# Altium PCB IDC_Tester_v1.PcbDoc (part 5 of 5)
Units mm, origin at the board's own origin, x right, y up, seen from the top; angles counter-clockwise.
Board outline 140 x 140 mm, 2 copper layers (Top Layer, Bottom Layer); 594 components, 528 nets, 1855 pads, 179 vias.
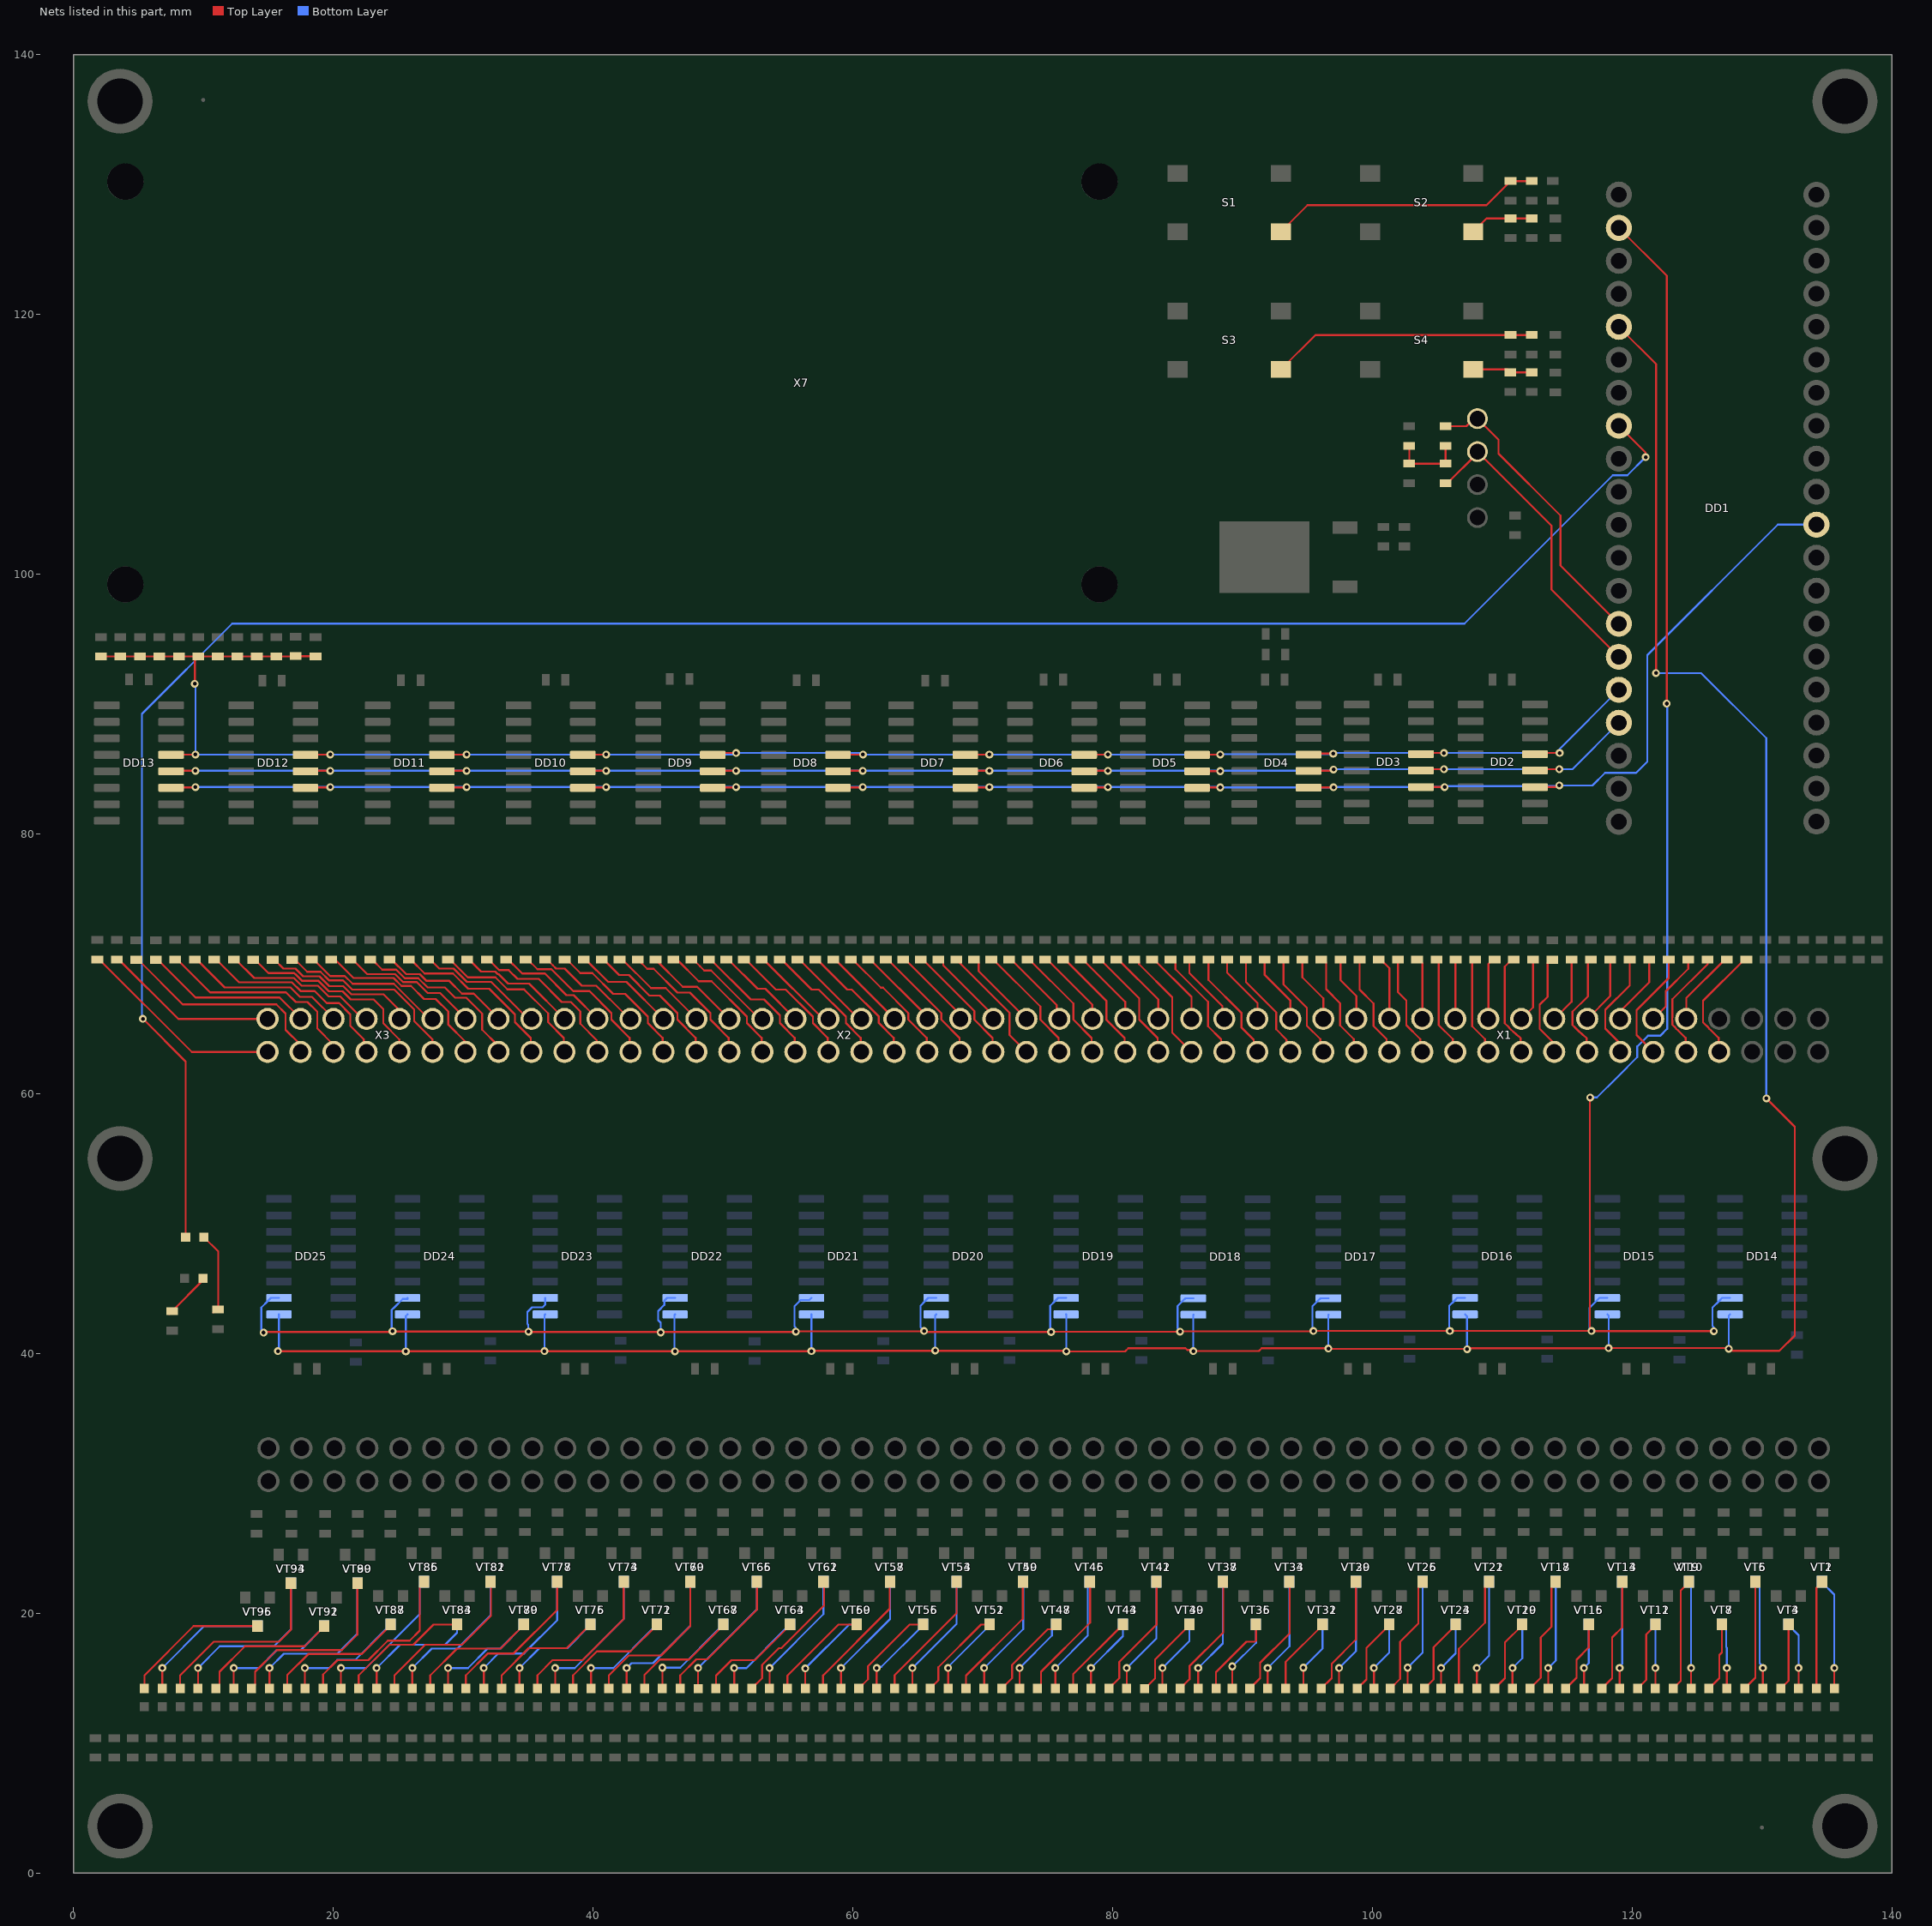
[diagram p4: the nets of this part, all layers, seen from the top]

## Via types
v1: diameter 0.6, hole 0.3, Top Layer to Bottom Layer, 179 vias

## Nets (pads, with @x,y where several pads share a name; then routed paths per layer and width w, separated by ;. In a path a pad name is that pad's centre, name@x,y a point inside that pad or via, vN(x,y) a via of type N, cw(c..) or ccw(c..) an arc to the next point about the centre after c; other vN are vias at no path point) (continued)
NetR224_2: R224.2 X1.8 | length 9.1
  Top Layer w0.15: X1.8@126.725,63.21 126.67,63.265 126.67,64.285 126.061,64.894 126.054,64.901 cw(c126.713,65.75) 125.864,65.091 125.857,65.098 125.519,65.436 125.475,65.48 125.475,67.15 128.65,70.325 R224.2@128.8,70.325
NetR225_2: R225.2 X1.9 | length 6
  Top Layer w0.15: X1.9@124.185,65.75 124.185,67.36 127.15,70.325 R225.2@127.3,70.325
NetR226_2: R226.2 X1.10 | length 8.7
  Top Layer w0.15: X1.10@124.185,63.21 124.13,63.265 124.13,64.285 123.521,64.894 123.514,64.901 cw(c124.173,65.75) 123.324,65.091 123.317,65.098 123.11,65.305 123.11,65.59 cw(c124.173,65.75) 123.11,65.91 123.11,66.791 123.11,67.26 125.825,69.975 R226.2@125.825,70.325
NetR227_2: R227.2 X1.11 | length 5.7
  Top Layer w0.15: X1.11@121.645,65.75 122.6,66.705 122.6,67.875 124.325,69.6 R227.2@124.325,70.325
NetR228_2: R228.2 X1.12 | length 8.7
  Top Layer w0.15: X1.12@121.645,63.21 120.35,64.505 120.35,66.425 122.825,68.9 R228.2@122.825,70.325
NetR229_2: R229.2 X1.13 | length 5.5
  Top Layer w0.15: X1.13@119.093,65.75 119.093,66.343 121.325,68.575 R229.2@121.325,70.325
NetR230_2: R230.2 X1.14 | length 8.4
  Top Layer w0.15: X1.14@119.105,63.21 119.05,63.265 119.05,63.9 119.006,63.944 117.95,65 117.95,66.45 119.825,68.325 R230.2@119.825,70.325
NetR231_2: R231.2 X1.15 | length 5.3
  Top Layer w0.15: X1.15@116.565,65.75 118.325,67.51 R231.2@118.325,70.325
NetR232_2: R232.2 X1.16 | length 8.2
  Top Layer w0.15: X1.16@116.565,63.21 116.51,63.265 116.51,64.211 ccw(c116.36,64.211) 116.452,64.329 cw(c121.567,70.92) 115.691,64.997 cw(c116.449,65.76) 115.6,65.101 115.425,65.276 115.425,66.3 116.6,67.475 116.6,70.1 R232.2@116.825,70.325
NetR233_2: R233.2 X1.17 | length 5.1
  Top Layer w0.15: X1.17@114.025,65.75 115.35,67.075 R233.2@115.35,70.325
NetR234_2: R234.2 X1.18 | length 8.1
  Top Layer w0.15: R234.2@113.875,70.3 113.725,70.3 113.5,70.075 113.5,67.45 112.896,66.846 112.896,64.979 113.926,63.949 113.97,63.905 113.97,63.265 X1.18@114.025,63.21
NetR235_2: R235.2 X1.19 | length 4.9
  Top Layer w0.15: X1.19@111.485,65.75 112.375,66.64 R235.2@112.375,70.325
NetR236_2: R236.2 X1.20 | length 8
  Top Layer w0.15: R236.2@110.9,70.325 110.75,70.325 110.2,69.775 110.2,65.421 110.525,65.096 ccw(c111.374,65.755) 110.616,64.993 ccw(c116.456,70.879) 111.372,64.329 cw(c111.28,64.211) 111.43,64.211 111.43,63.265 X1.20@111.485,63.21
NetR237_2: R237.2 X1.21 | length 4.9
  Top Layer w0.15: X1.21@108.945,65.75 108.945,69.995 109.275,70.325 R237.2@109.425,70.325
NetR238_2: R238.2 X1.22 | length 7.7
  Top Layer w0.15: R238.2@107.925,70.325 107.7,70.1 107.7,65.178 108.691,64.188 108.691,63.464 X1.22@108.945,63.21
NetR239_2: R239.2 X1.23 | length 4.6
  Top Layer w0.15: X1.23@106.405,65.75 106.405,70.305 R239.2@106.425,70.325
NetR240_2: R240.2 X1.24 | length 7.7
  Top Layer w0.15: R240.2@104.95,70.325 105.125,70.15 105.125,65.275 106.203,64.197 106.203,63.412 X1.24@106.405,63.21
NetR241_2: R241.2 X1.25 | length 4.8
  Top Layer w0.15: R241.2@103.45,70.325 103.6,70.325 103.865,70.06 X1.25@103.865,65.75
NetR242_2: R242.2 X1.26 | length 7.9
  Top Layer w0.15: R242.2@101.975,70.325 101.975,67.81 102.625,67.16 102.625,65.275 103.703,64.197 103.703,63.372 X1.26@103.865,63.21
NetR243_2: R243.2 X1.27 | length 5
  Top Layer w0.15: R243.2@100.5,70.325 100.65,70.325 101.325,69.65 X1.27@101.325,65.75
NetR244_2: R244.2 X1.28 | length 8.1
  Top Layer w0.15: R244.2@99.025,70.325 99.025,68.015 100.1,66.94 100.1,65.2 101.103,64.197 101.103,63.432 X1.28@101.325,63.21
NetR245_2: R245.2 X1.29 | length 5.1
  Top Layer w0.15: R245.2@97.55,70.325 97.55,68.752 98.785,67.517 X1.29@98.785,65.75
NetR246_2: R246.2 X1.30 | length 8.3
  Top Layer w0.15: R246.2@96.075,70.325 96.225,70.325 96.45,70.1 96.45,68.032 97.525,66.957 97.525,65.25 98.578,64.197 98.578,63.417 X1.30@98.785,63.21
NetR247_2: R247.2 X1.31 | length 5.2
  Top Layer w0.15: R247.2@94.625,70.325 94.625,68.945 96.245,67.325 X1.31@96.245,65.75
NetR248_2: R248.2 X1.32 | length 8.4
  Top Layer w0.15: R248.2@93.175,70.325 93.175,68.4 94.975,66.6 94.975,65.225 96.003,64.197 96.003,63.452 X1.32@96.245,63.21
NetR249_2: R249.2 X1.33 | length 5.4
  Top Layer w0.15: R249.2@91.725,70.325 91.725,69.125 93.705,67.145 X1.33@93.705,65.75
NetR250_2: R250.2 X1.34 | length 8.5
  Top Layer w0.15: R250.2@90.275,70.325 90.275,68.58 92.6,66.255 92.6,64.95 93.406,64.144 93.406,63.509 X1.34@93.705,63.21
NetR251_2: R251.2 X1.35 | length 5.5
  Top Layer w0.15: R251.2@88.825,70.325 88.825,69.305 91.165,66.965 X1.35@91.165,65.75
NetR252_2: R252.2 X1.36 | length 8.7
  Top Layer w0.15: R252.2@87.4,70.325 87.4,68.747 89.925,66.222 89.925,65.1 90.874,64.151 90.874,63.501 X1.36@91.165,63.21
NetR253_2: R253.2 X1.37 | length 5.7
  Top Layer w0.15: R253.2@85.925,70.325 85.925,69.275 88.463,66.737 88.463,65.912 X1.37@88.625,65.75
NetR254_2: R254.2 X1.38 | length 8.9
  Top Layer w0.15: R254.2@84.475,70.325 84.625,70.325 84.85,70.1 84.85,69.575 87.364,67.061 87.364,65.186 88.366,64.184 88.366,63.469 X1.38@88.625,63.21
NetR255_2: R255.2 X1.39 | length 5.9
  Top Layer w0.15: R255.2@83.05,70.325 83.2,70.325 86.085,67.44 X1.39@86.085,65.75
NetR256_2: R256.2 X1.40 | length 9
  Top Layer w0.15: R256.2@81.675,70.325 81.825,70.325 82.05,70.1 82.05,69.975 84.607,67.418 84.607,64.688 X1.40@86.085,63.21
NetR257_2: R257.2 X2.1 | length 6
  Top Layer w0.15: R257.2@80.3,70.325 80.45,70.325 83.532,67.243 X2.1@83.532,65.75
NetR258_2: R258.2 X2.2 | length 9.1
  Top Layer w0.15: R258.2@78.925,70.325 79.075,70.325 82.067,67.333 82.067,65.695 83.477,64.285 83.477,63.265 X2.2@83.532,63.21
NetR259_2: R259.2 X2.3 | length 6.1
  Top Layer w0.15: R259.2@77.575,70.325 77.725,70.325 80.992,67.058 X2.3@80.992,65.75
NetR260_2: R260.2 X2.4 | length 9.2
  Top Layer w0.15: R260.2@76.2,70.325 76.35,70.325 79.527,67.148 79.527,65.695 80.937,64.285 80.937,63.265 X2.4@80.992,63.21
NetR261_2: R261.2 X2.5 | length 6.2
  Top Layer w0.15: R261.2@74.825,70.325 74.975,70.325 78.452,66.848 X2.5@78.452,65.75
NetR262_2: R262.2 X2.6 | length 9.3
  Top Layer w0.15: R262.2@73.45,70.325 73.6,70.325 76.987,66.938 76.987,65.695 78.397,64.285 78.397,63.265 X2.6@78.452,63.21
NetR263_2: R263.2 X2.7 | length 6.3
  Top Layer w0.15: R263.2@72.05,70.325 72.2,70.325 75.7,66.825 75.7,65.962 X2.7@75.912,65.75
NetR264_2: R264.2 X2.8 | length 9.4
  Top Layer w0.15: R264.2@70.675,70.325 70.825,70.325 74.447,66.703 74.447,65.695 75.857,64.285 75.857,63.265 X2.8@75.912,63.21
NetR265_2: R265.2 X2.9 | length 6.3
  Top Layer w0.15: R265.2@69.325,70.325 69.475,70.325 69.7,70.1 69.7,69.422 X2.9@73.372,65.75
NetR266_2: R266.2 X2.10 | length 9.4
  Top Layer w0.15: R266.2@67.975,70.325 72.075,66.225 72.075,64.507 X2.10@73.372,63.21
NetR267_2: R267.2 X2.11 | length 6.4
  Top Layer w0.15: R267.2@66.6,70.325 66.75,70.325 66.975,70.1 66.975,69.875 70.832,66.018 X2.11@70.832,65.75
NetR268_2: R268.2 X2.12 | length 9.5
  Top Layer w0.15: R268.2@65.25,70.325 65.4,70.325 69.367,66.358 69.367,65.695 70.777,64.285 70.777,63.265 X2.12@70.832,63.21
NetR269_2: R269.2 X2.13 | length 6.5
  Top Layer w0.15: R269.2@63.9,70.325 64.05,70.325 68.292,66.083 X2.13@68.292,65.75
NetR270_2: R270.2 X2.14 | length 9.6
  Top Layer w0.15: R270.2@62.55,70.325 62.7,70.325 66.827,66.198 66.827,65.695 68.237,64.285 68.237,63.265 X2.14@68.292,63.21
NetR271_2: R271.2 X2.15 | length 6.5
  Top Layer w0.15: R271.2@61.2,70.325 61.35,70.325 65.752,65.923 X2.15@65.752,65.75
NetR272_2: R272.2 X2.16 | length 9.7
  Top Layer w0.15: R272.2@59.85,70.325 60,70.325 62.177,68.148 62.335,68.148 64.287,66.195 64.287,65.695 65.697,64.285 65.697,63.265 X2.16@65.752,63.21
NetR273_2: R273.2 X2.17 | length 6.6
  Top Layer w0.15: R273.2@58.5,70.325 58.65,70.325 63.212,65.763 X2.17@63.212,65.75
NetR274_2: R274.2 X2.18 | length 9.9
  Top Layer w0.15: R274.2@57.125,70.325 57.275,70.325 59.587,68.013 59.929,68.013 62.016,65.926 62.016,65.425 63.157,64.285 63.157,63.265 X2.18@63.212,63.21
NetR275_2: R275.2 X2.19 | length 6.8
  Top Layer w0.15: R275.2@55.75,70.325 55.9,70.325 60.475,65.75 X2.19@60.672,65.75
NetR276_2: R276.2 X2.20 | length 10.1
  Top Layer w0.15: R276.2@54.375,70.325 54.525,70.325 56.837,68.013 57.389,68.013 59.476,65.926 59.476,65.425 60.617,64.285 60.617,63.265 X2.20@60.672,63.21
NetR277_2: R277.2 X2.21 | length 7
  Top Layer w0.15: R277.2@53,70.325 53.15,70.325 57.725,65.75 X2.21@58.132,65.75
NetR278_2: R278.2 X2.22 | length 10.3
  Top Layer w0.15: R278.2@51.625,70.325 51.775,70.325 54.087,68.013 54.849,68.013 56.936,65.926 56.936,65.425 58.077,64.285 58.077,63.265 X2.22@58.132,63.21
NetR279_2: R279.2 X2.23 | length 7.2
  Top Layer w0.15: R279.2@50.275,70.325 50.425,70.325 52.677,68.073 53.269,68.073 X2.23@55.592,65.75
NetR280_2: R280.2 X2.24 | length 10.6
  Top Layer w0.15: R280.2@48.925,70.325 49.075,70.325 52.15,67.25 53.175,67.25 54.396,66.029 54.396,65.425 55.537,64.285 55.537,63.265 X2.24@55.592,63.21
NetR281_2: R281.2 X2.25 | length 7.4
  Top Layer w0.15: R281.2@47.575,70.325 47.725,70.325 48.25,69.8 48.575,69.475 49.1,69.475 52.825,65.75 X2.25@53.052,65.75
NetR282_2: R282.2 X2.26 | length 10.7
  Top Layer w0.15: R282.2@46.2,70.325 46.475,70.325 48.15,68.65 49.132,68.65 51.856,65.926 51.856,65.425 52.997,64.285 52.997,63.265 X2.26@53.052,63.21
NetR283_2: R283.2 X2.27 | length 7.6
  Top Layer w0.15: R283.2@44.825,70.325 46.925,68.225 48.026,68.225 50.501,65.75 X2.27@50.512,65.75
NetR284_2: R284.2 X2.28 | length 10.9
  Top Layer w0.15: R284.2@43.45,70.325 44.175,69.6 44.675,69.6 46.502,67.773 47.469,67.773 49.047,66.195 49.047,65.695 50.457,64.285 50.457,63.265 X2.28@50.512,63.21
NetR285_2: R285.2 X2.29 | length 7.8
  Top Layer w0.15: R285.2@42.05,70.325 42.275,70.325 44.475,68.125 45.597,68.125 X2.29@47.972,65.75
NetR286_2: R286.2 X2.30 | length 11.1
  Top Layer w0.15: R286.2@40.675,70.325 40.825,70.325 42.025,69.125 42.775,69.125 44.35,67.55 45.152,67.55 46.507,66.195 46.507,65.695 47.917,64.285 47.917,63.265 X2.30@47.972,63.21
NetR287_2: R287.2 X2.31 | length 8
  Top Layer w0.15: R287.2@39.3,70.325 39.45,70.325 41.175,68.6 42.582,68.6 X2.31@45.432,65.75
NetR288_2: R288.2 X2.32 | length 11.4
  Top Layer w0.15: R288.2@37.825,70.325 37.975,70.325 38.2,70.1 39.025,69.275 39.95,69.275 41.55,67.675 42.487,67.675 44.236,65.926 44.236,65.425 45.377,64.285 45.377,63.265 X2.32@45.432,63.21
NetR289_2: R289.2 X2.33 | length 8.5
  Top Layer w0.15: R289.2@36.325,70.325 36.475,70.325 36.925,69.875 37.175,69.625 37.825,69.625 39.15,68.3 40.25,68.3 41.289,67.262 41.313,67.262 42.825,65.75 X2.33@42.892,65.75
NetR290_2: R290.2 X2.34 | length 11.9
  Top Layer w0.15: R290.2@34.825,70.325 34.975,70.325 35.725,69.575 36.8,69.575 38.49,67.885 39.737,67.885 41.427,66.195 41.427,65.695 42.837,64.285 42.837,63.265 X2.34@42.892,63.21
NetR291_2: R291.2 X2.35 | length 8.9
  Top Layer w0.15: R291.2@33.325,70.325 33.475,70.325 34.328,69.472 34.562,69.238 36.312,69.238 37.965,67.585 38.517,67.585 X2.35@40.352,65.75
NetR292_2: R292.2 X2.36 | length 12.5
  Top Layer w0.15: R292.2@31.825,70.325 31.975,70.325 32.8,69.5 33.525,69.5 34.2,68.825 35.825,68.825 37.6,67.05 38.3,67.05 39.025,66.325 39.025,65.375 40.297,64.103 40.297,63.265 X2.36@40.352,63.21
NetR293_2: R293.2 X2.37 | length 9.4
  Top Layer w0.15: R293.2@30.325,70.325 30.475,70.325 31.4,69.4 32.475,69.4 32.676,69.2 32.75,69.2 33.475,68.475 35.087,68.475 X2.37@37.812,65.75
NetR294_2: R294.2 X2.38 | length 12.9
  Top Layer w0.15: R294.2@28.85,70.325 29,70.325 30.375,68.95 32.501,68.95 33.426,68.025 34.7,68.025 36.55,66.175 36.55,65.492 37.757,64.285 37.757,63.265 X2.38@37.812,63.21
NetR295_2: R295.2 X2.39 | length 9.8
  Top Layer w0.15: R295.2@27.325,70.325 27.475,70.325 28.175,69.625 29.276,69.625 30.301,68.6 32.175,68.6 35.025,65.75 X2.39@35.272,65.75
NetR296_2: R296.2 X2.40 | length 13.3
  Top Layer w0.15: R296.2@25.825,70.325 25.975,70.325 27.05,69.25 29.226,69.25 30.401,68.075 32.025,68.075 34,66.1 34,65.502 35.217,64.285 35.217,63.265 X2.40@35.272,63.21
NetR297_2: R297.2 X3.1 | length 10.3
  Top Layer w0.15: R297.2@24.35,70.325 24.5,70.325 25.625,69.2 26.676,69.2 27.201,68.675 28.95,68.675 29.925,67.7 30.822,67.7 X3.1@32.782,65.74
NetR298_2: R298.2 X3.2 | length 13.8
  Top Layer w0.15: R298.2@22.85,70.325 23,70.325 23.775,69.55 24.851,69.55 25.513,68.888 26.564,68.888 27.276,68.175 28.6,68.175 29.4,67.375 30.253,67.375 31.475,66.153 31.475,64.925 32.678,63.722 32.678,63.304 X3.2@32.782,63.2
NetR299_2: R299.2 X3.3 | length 10.8
  Top Layer w0.15: R299.2@21.35,70.325 21.5,70.325 22.625,69.2 24.776,69.2 25.389,68.588 26.439,68.588 27.277,67.75 28.232,67.75 X3.3@30.242,65.74
NetR300_2: R300.2 X3.4 | length 14.4
  Top Layer w0.15: R300.2@19.85,70.325 20.15,70.325 21.575,68.9 22.501,68.9 24.652,68.9 25.264,68.288 25.987,68.288 27,67.275 27.9,67.275 28.875,66.3 28.875,65.3 30.187,63.988 30.187,63.255 X3.4@30.242,63.2
NetR301_2: R301.2 X3.5 | length 11.3
  Top Layer w0.15: R301.2@18.35,70.325 18.5,70.325 19.775,69.05 20.9,69.05 21.5,68.45 24.678,68.45 27.388,65.74 X3.5@27.702,65.74
NetR302_2: R302.2 X3.6 | length 14.8
  Top Layer w0.15: R302.2@16.85,70.3 17.075,70.3 18,69.375 19.026,69.375 19.676,68.725 20.751,68.725 21.476,68 24.704,68 26.237,66.467 26.237,65.588 27.647,64.178 X3.6@27.647,63.255
NetR303_2: R303.2 X3.7 | length 12.1
  Top Layer w0.15: R303.2@15.35,70.3 15.5,70.3 16.175,69.625 17.1,69.625 17.7,69.025 18.951,69.025 19.701,68.275 20.777,68.275 21.402,67.65 23.875,67.65 25.162,66.363 X3.7@25.162,65.74
NetR304_2: R304.2 X3.8 | length 15.3
  Top Layer w0.15: R304.2@13.85,70.3 14,70.3 15.025,69.275 17,69.275 17.075,69.2 17.099,69.2 17.624,68.675 18.877,68.675 19.677,67.875 20.725,67.875 20.825,67.775 21.35,67.25 23.116,67.25 23.865,66.5 23.865,65.41 25.107,64.168 X3.8@25.107,63.255
NetR305_2: R305.2 X3.9 | length 12.2
  Top Layer w0.15: R305.2@12.35,70.325 12.5,70.325 13.925,68.9 16.975,68.9 17.575,68.3 18.828,68.3 19.653,67.475 20.55,67.475 22.285,65.74 X3.9@22.622,65.74
NetR306_2: R306.2 X3.10 | length 15.7
  Top Layer w0.15: R306.2@10.85,70.325 11,70.325 12.75,68.575 16.825,68.575 17.5,67.9 18.575,67.9 19.51,66.965 20.46,66.965 21.325,66.1 21.325,65.225 22.368,64.182 22.368,63.454 X3.10@22.622,63.2
NetR307_2: R307.2 X3.11 | length 12.6
  Top Layer w0.15: R307.2@9.35,70.325 9.5,70.325 11.65,68.175 16.725,68.175 17.45,67.45 18.372,67.45 X3.11@20.082,65.74
NetR308_2: R308.2 X3.12 | length 16.2
  Top Layer w0.15: R308.2@7.85,70.325 8,70.325 10.525,67.8 16.375,67.8 17.125,67.05 18.025,67.05 18.775,66.3 18.775,65.025 20.027,63.773 20.027,63.255 X3.12@20.082,63.2
NetR309_2: R309.2 X3.13 | length 13.1
  Top Layer w0.15: R309.2@6.35,70.3 6.5,70.3 9.4,67.4 15.882,67.4 X3.13@17.542,65.74
NetR310_2: R310.2 X3.14 | length 16.7
  Top Layer w0.15: R310.2@4.85,70.3 5,70.3 8.425,66.875 15.625,66.875 16.346,66.154 16.346,64.904 17.487,63.763 17.487,63.255 X3.14@17.542,63.2
NetR311_2: R311.2 X3.15 | length 13.6
  Top Layer w0.15: R311.2@3.35,70.325 3.5,70.325 8.085,65.74 X3.15@15.002,65.74
NetR312_2: R312.2 X3.16 | length 16.1
  Top Layer w0.15: R312.2@1.85,70.325 2,70.325 9.125,63.2 X3.16@15.002,63.2
NetR313_1: R313.1 VD97.A | length 4
  Top Layer w0.15: R313.1@7.375,43.025 R313.1@7.6,43.25 9.975,45.625 VD97.A@9.975,45.775 VD97.A@10.075,45.675
NetR315_1: R315.1 VD98.A | length 6.6
  Top Layer w0.15: VD98.A@10.15,49.05 VD98.A@10.05,48.95 11.15,47.85 R315.1@11.15,43.375 11,43.375 R315.1@10.775,43.15
NetR317_2: R317.2 R318.1 S1.1 | length 20.9
  Top Layer w0.15: S1.1@92.975,126.35 95.025,128.4 108.8,128.4 R317.2@110.65,130.25 R318.1@112.275,130.25
NetR319_2: R319.2 R320.1 S2.1 | length 4.9
  Top Layer w0.15: S2.1@107.775,126.35 108.8,127.375 R319.2@110.65,127.375 R320.1@112.275,127.375
NetR321_2: R321.2 R322.2 R323.1 R324.1 | length 5.6
  Top Layer w0.15: R324.1@102.85,109.875 R323.1@102.85,108.5 R322.2@105.65,108.5 R321.2@105.65,109.875
NetR325_2: R325.2 R326.1 S3.1 | length 20.4
  Top Layer w0.15: S3.1@92.975,115.75 95.625,118.4 R325.2@110.65,118.4 R326.1@112.275,118.4
NetR327_2: R327.2 R328.1 S4.1 | length 4.6
  Top Layer w0.15: S4.1@107.775,115.75 110.4,115.75 R327.2@110.625,115.525 R328.1@112.275,115.525
NetVD1_K: VD1.K VT1.3 | length 8.6
  Top Layer w0.15: VD1.K@135.575,14.2 v1(135.575,15.775)
  Bottom Layer w0.15: VT1.3@134.625,22.425 134.625,22.375 135.575,21.425 v1(135.575,15.775)
NetVD2_K: VD2.K VT2.3 | length 8.4
  Top Layer w0.15: VD2.K@134.2,14.2 134.2,21.95 134.625,22.375 VT2.3@134.625,22.425
NetVD3_K: VD3.K VT3.3 | length 5.2
  Top Layer w0.15: VD3.K@132.825,14.2 v1(132.825,15.775)
  Bottom Layer w0.15: VT3.3@132.05,19.125 132.05,19.075 132.825,18.3 v1(132.825,15.775)
NetVD4_K: VD4.K VT4.3 | length 5.2
  Top Layer w0.15: VD4.K@131.45,14.2 132.05,14.8 VT4.3@132.05,19.125
NetVD5_K: VD5.K VT5.3 | length 8.5
  Top Layer w0.15: VD5.K@130.075,14.2 v1(130.075,15.775)
  Bottom Layer w0.15: VT5.3@129.5,22.425 129.825,22.1 129.825,16.147 130.075,15.897 v1(130.075,15.775)
NetVD6_K: VD6.K VT6.3 | length 8.6
  Top Layer w0.15: VD6.K@128.675,14.2 129.5,15.025 129.5,18.538 VT6.3@129.5,22.425
NetVD7_K: VD7.K VT7.3 | length 5.1
  Top Layer w0.15: VD7.K@127.3,14.2 v1(127.3,15.775)
  Bottom Layer w0.15: VT7.3@126.925,19.125 127.25,18.8 127.25,17.391 127.3,17.341 v1(127.3,15.775)
NetVD8_K: VD8.K VT8.3 | length 5.3
  Top Layer w0.15: VD8.K@125.925,14.2 126.725,15 126.725,16.775 126.925,16.975 VT8.3@126.925,19.125
NetVD9_K: VD9.K VT9.3 | length 8.3
  Top Layer w0.15: VD9.K@124.55,14.2 v1(124.55,15.775)
  Bottom Layer w0.15: VT9.3@124.375,22.425 124.55,22.25 v1(124.55,15.775)
NetVD10_K: VD10.K VT10.3 | length 8.7
  Top Layer w0.15: VD10.K@123.175,14.2 123.75,14.775 123.75,21.75 124.375,22.375 VT10.3@124.375,22.425
NetVD11_K: VD11.K VT11.3 | length 4.9
  Top Layer w0.15: VD11.K@121.8,14.2 v1(121.8,15.775)
  Bottom Layer w0.15: v1(121.8,15.775) VT11.3@121.8,19.125
NetVD12_K: VD12.K VT12.3 | length 5.5
  Top Layer w0.15: VD12.K@120.425,14.2 121.088,14.863 121.088,18.363 121.8,19.075 VT12.3@121.8,19.125
NetVD13_K: VD13.K VT13.3 | length 8.3
  Top Layer w0.15: VD13.K@119.05,14.2 v1(119.05,15.775)
  Bottom Layer w0.15: v1(119.05,15.775) 119.05,15.897 119.25,16.097 VT13.3@119.25,22.425
NetVD14_K: VD14.K VT14.3 | length 8.9
  Top Layer w0.15: VD14.K@117.675,14.2 118.475,15 118.475,18.138 119.25,18.913 VT14.3@119.25,22.425
NetVD15_K: VD15.K VT15.3 | length 5.1
  Top Layer w0.15: VD15.K@116.3,14.2 v1(116.3,15.775)
  Bottom Layer w0.15: v1(116.3,15.775) 116.675,16.15 VT15.3@116.675,19.125
NetVD16_K: VD16.K VT16.3 | length 5.7
  Top Layer w0.15: VD16.K@114.9,14.2 115.725,15.025 115.725,16.413 116.675,17.363 VT16.3@116.675,19.125
NetVD17_K: VD17.K VT17.3 | length 8.5
  Top Layer w0.15: VD17.K@113.55,14.2 v1(113.55,15.775)
  Bottom Layer w0.15: v1(113.55,15.775) 114.125,16.35 VT17.3@114.125,22.425
NetVD18_K: VD18.K VT18.3 | length 9
  Top Layer w0.15: VD18.K@112.15,14.2 112.975,15.025 112.975,18.125 113.8,18.95 113.8,22.1 VT18.3@114.125,22.425
NetVD19_K: VD19.K VT19.3 | length 5.2
  Top Layer w0.15: VD19.K@110.8,14.2 v1(110.8,15.775)
  Bottom Layer w0.15: v1(110.8,15.775) 111.55,16.525 VT19.3@111.55,19.125
NetVD20_K: VD20.K VT20.3 | length 5.8
  Top Layer w0.15: VD20.K@109.425,14.2 110.225,15 110.225,17.75 111.55,19.075 VT20.3@111.55,19.125
NetVD21_K: VD21.K VT21.3 | length 8.6
  Top Layer w0.15: VD21.K@108.05,14.2 v1(108.05,15.775)
  Bottom Layer w0.15: v1(108.05,15.775) 109,16.725 VT21.3@109,22.425
NetVD22_K: VD22.K VT22.3 | length 9.2
  Top Layer w0.15: VD22.K@106.675,14.2 106.675,17.263 108.675,19.263 108.675,22.1 VT22.3@109,22.425
NetVD23_K: VD23.K VT23.3 | length 5.4
  Top Layer w0.15: VD23.K@105.3,14.2 v1(105.3,15.775)
  Bottom Layer w0.15: v1(105.3,15.775) 106.425,16.9 VT23.3@106.425,19.125
NetVD24_K: VD24.K VT24.3 | length 5.9
  Top Layer w0.15: VD24.K@104.025,14.2 104.725,14.9 104.725,17.375 106.425,19.075 VT24.3@106.425,19.125
NetVD25_K: VD25.K VT25.3 | length 8.7
  Top Layer w0.15: VD25.K@102.725,14.2 v1(102.725,15.8)
  Bottom Layer w0.15: v1(102.725,15.8) 103.875,16.95 VT25.3@103.875,22.425
NetVD26_K: VD26.K VT26.3 | length 9.3
  Top Layer w0.15: VD26.K@101.4,14.2 102.15,14.95 102.15,17.8 103.55,19.2 103.55,22.1 VT26.3@103.875,22.425
NetVD27_K: VD27.K VT27.3 | length 5.4
  Top Layer w0.15: VD27.K@100.125,14.2 v1(100.125,15.775)
  Bottom Layer w0.15: v1(100.125,15.775) 101.3,16.95 VT27.3@101.3,19.125
NetVD28_K: VD28.K VT28.3 | length 5.9
  Top Layer w0.15: VD28.K@98.85,14.2 99.55,14.9 99.55,17.325 101.3,19.075 VT28.3@101.3,19.125
NetVD29_K: VD29.K VT29.3 | length 8.8
  Top Layer w0.15: VD29.K@97.45,14.2 v1(97.45,15.775)
  Bottom Layer w0.15: v1(97.45,15.775) 98.75,17.075 VT29.3@98.75,22.425
NetVD30_K: VD30.K VT30.3 | length 9.3
  Top Layer w0.15: VD30.K@96.075,14.2 96.875,15 96.875,16.1 98.75,17.975 VT30.3@98.75,22.425
NetVD31_K: VD31.K VT31.3 | length 5.5
  Top Layer w0.15: VD31.K@94.7,14.2 v1(94.7,15.8)
  Bottom Layer w0.15: v1(94.7,15.8) 96.175,17.275 VT31.3@96.175,19.125
NetVD32_K: VD32.K VT32.3 | length 6.1
  Top Layer w0.15: VD32.K@93.325,14.2 93.325,16.225 96.175,19.075 VT32.3@96.175,19.125
NetVD33_K: VD33.K VT33.3 | length 8.9
  Top Layer w0.15: VD33.K@91.95,14.2 v1(91.95,15.775)
  Bottom Layer w0.15: v1(91.95,15.775) 93.625,17.45 VT33.3@93.625,22.425
NetVD34_K: VD34.K VT34.3 | length 9.5
  Top Layer w0.15: VD34.K@90.575,14.2 91.375,15 91.375,16.175 93.65,18.45 93.65,22.4 VT34.3@93.625,22.425
NetVD35_K: VD35.K VT35.3 | length 5.7
  Top Layer w0.15: VD35.K@89.225,14.2 v1(89.225,15.9)
  Bottom Layer w0.15: v1(89.225,15.9) 91.05,17.725 VT35.3@91.05,19.125
NetVD36_K: VD36.K VT36.3 | length 6.6
  Top Layer w0.15: VD36.K@87.975,14.2 87.975,15.463 90.312,17.8 90.962,17.8 91.05,17.888 VT36.3@91.05,19.125
NetVD37_K: VD37.K VT37.3 | length 9
  Top Layer w0.15: VD37.K@86.6,14.2 v1(86.6,15.775)
  Bottom Layer w0.15: v1(86.6,15.775) 88.5,17.675 VT37.3@88.5,22.425
NetVD38_K: VD38.K VT38.3 | length 9.6
  Top Layer w0.15: VD38.K@85.225,14.2 85.931,14.906 85.931,15.919 88.525,18.513 88.525,22.4 VT38.3@88.5,22.425
NetVD39_K: VD39.K VT39.3 | length 5.8
  Top Layer w0.15: VD39.K@83.85,14.2 v1(83.85,15.775)
  Bottom Layer w0.15: v1(83.85,15.775) 85.925,17.85 VT39.3@85.925,19.125
NetVD40_K: VD40.K VT40.3 | length 6.4
  Top Layer w0.15: VD40.K@82.475,14.175 83.275,14.975 83.275,16.425 85.925,19.075 VT40.3@85.925,19.125
NetVD41_K: VD41.K VT41.3 | length 9.2
  Top Layer w0.15: VD41.K@81.1,14.2 v1(81.1,15.775)
  Bottom Layer w0.15: v1(81.1,15.775) 83.375,18.05 VT41.3@83.375,22.425
NetVD42_K: VD42.K VT42.3 | length 9.8
  Top Layer w0.15: VD42.K@79.725,14.2 80.525,15 80.525,16.25 83.4,19.125 83.4,22.4 VT42.3@83.375,22.425
NetVD43_K: VD43.K VT43.3 | length 5.9
  Top Layer w0.15: VD43.K@78.35,14.2 v1(78.35,15.775)
  Bottom Layer w0.15: v1(78.35,15.775) 80.8,18.225 VT43.3@80.8,19.125
NetVD44_K: VD44.K VT44.3 | length 6.5
  Top Layer w0.15: VD44.K@76.975,14.2 76.975,15.3 VT44.3@80.8,19.125
NetVD45_K: VD45.K VT45.3 | length 9.3
  Top Layer w0.15: VD45.K@75.6,14.2 v1(75.6,15.775)
  Bottom Layer w0.15: v1(75.6,15.775) 78.1,18.275 78.1,22.275 VT45.3@78.25,22.425
NetVD46_K: VD46.K VT46.3 | length 9.9
  Top Layer w0.15: VD46.K@74.225,14.2 74.5,14.475 74.5,15.488 78.275,19.263 78.275,22.4 VT46.3@78.25,22.425
NetVD47_K: VD47.K VT47.3 | length 6.1
  Top Layer w0.15: VD47.K@72.85,14.2 v1(72.85,15.775)
  Bottom Layer w0.15: v1(72.85,15.775) 75.35,18.275 75.35,18.8 VT47.3@75.675,19.125
NetVD48_K: VD48.K VT48.3 | length 6.9
  Top Layer w0.15: VD48.K@71.475,14.2 72.275,15 72.275,16.013 75.012,18.75 75.35,18.75 75.675,19.075 VT48.3@75.675,19.125
NetVD49_K: VD49.K VT49.3 | length 9.5
  Top Layer w0.15: VD49.K@70.1,14.2 70.125,14.225 v1(70.125,15.775)
  Bottom Layer w0.15: v1(70.125,15.775) 73.125,18.775 VT49.3@73.125,22.425
NetVD50_K: VD50.K VT50.3 | length 10
  Top Layer w0.15: VD50.K@68.725,14.2 68.725,15.188 73.1,19.563 73.1,22.4 VT50.3@73.125,22.425
NetVD51_K: VD51.K VT51.3 | length 6.3
  Top Layer w0.15: VD51.K@67.35,14.2 v1(67.35,15.775)
  Bottom Layer w0.15: v1(67.35,15.775) 67.35,15.875 70.55,19.075 VT51.3@70.55,19.125
NetVD52_K: VD52.K VT52.3 | length 7.2
  Top Layer w0.15: VD52.K@65.975,14.2 66.6,14.825 66.6,15.838 69.887,19.125 VT52.3@70.55,19.125
NetVD53_K: VD53.K VT53.3 | length 9.6
  Top Layer w0.15: VD53.K@64.6,14.2 v1(64.6,15.775)
  Bottom Layer w0.15: v1(64.6,15.775) 68,19.175 VT53.3@68,22.425
NetVD54_K: VD54.K VT54.3 | length 10.2
  Top Layer w0.15: VD54.K@63.225,14.2 63.225,15.225 68,20 VT54.3@68,22.425
NetVD55_K: VD55.K VT55.3 | length 6.6
  Top Layer w0.15: VD55.K@61.85,14.2 v1(61.85,15.775)
  Bottom Layer w0.15: v1(61.85,15.775) 61.936,15.861 62.211,15.861 65.425,19.075 VT55.3@65.425,19.125
NetVD56_K: VD56.K VT56.3 | length 7.6
  Top Layer w0.15: VD56.K@60.475,14.2 61.181,14.906 61.181,15.919 64.387,19.125 VT56.3@65.425,19.125
NetVD57_K: VD57.K VT57.3 | length 9.8
  Top Layer w0.15: VD57.K@59.1,14.2 v1(59.1,15.775)
  Bottom Layer w0.15: v1(59.1,15.775) 62.875,19.55 VT57.3@62.875,22.425
NetVD58_K: VD58.K VT58.3 | length 10.4
  Top Layer w0.15: VD58.K@57.725,14.2 57.725,15.213 62.85,20.338 62.85,22.4 VT58.3@62.875,22.425
NetVD59_K: VD59.K VT59.3 | length 6.9
  Top Layer w0.15: VD59.K@56.35,14.2 v1(56.35,15.75)
  Bottom Layer w0.15: v1(56.35,15.75) 59.725,19.125 VT59.3@60.3,19.125
NetVD60_K: VD60.K VT60.3 | length 7.9
  Top Layer w0.15: VD60.K@54.975,14.2 54.975,15.188 58.912,19.125 VT60.3@60.3,19.125
NetVD61_K: VD61.K VT61.3 | length 9.9
  Top Layer w0.15: VD61.K@53.6,14.2 v1(53.6,15.775)
  Bottom Layer w0.15: v1(53.6,15.775) 57.75,19.925 VT61.3@57.75,22.425
NetVD62_K: VD62.K VT62.3 | length 10.7
  Top Layer w0.15: VD62.K@52.225,14.2 53.025,15 53.025,16.013 54.309,17.297 54.516,17.297 57.8,20.582 57.8,22.375 VT62.3@57.75,22.425
NetVD63_K: VD63.K VT63.3 | length 7.3
  Top Layer w0.15: VD63.K@50.85,14.2 50.875,14.225 v1(50.875,15.775)
  Bottom Layer w0.15: v1(50.875,15.775) 51.825,15.775 54.8,18.75 54.85,18.75 55.175,19.075 VT63.3@55.175,19.125
NetVD64_K: VD64.K VT64.3 | length 8.3
  Top Layer w0.15: VD64.K@49.475,14.2 49.475,15.188 50.662,16.375 52.475,16.375 55.175,19.075 VT64.3@55.175,19.125
NetVD65_K: VD65.K VT65.3 | length 10.1
  Top Layer w0.15: VD65.K@48.1,14.175 v1(48.1,15.775)
  Bottom Layer w0.15: v1(48.1,15.775) 52.625,20.3 VT65.3@52.625,22.425
NetVD66_K: VD66.K VT66.3 | length 11.2
  Top Layer w0.15: VD66.K@46.725,14.2 46.725,15.213 47.962,16.45 48.8,16.45 52.625,20.275 VT66.3@52.625,22.425
NetVD67_K: VD67.K VT67.3 | length 7.7
  Top Layer w0.15: VD67.K@45.35,14.2 v1(45.35,15.8)
  Bottom Layer w0.15: v1(45.35,15.8) 46.725,15.8 49.675,18.75 49.725,18.75 50.05,19.075 VT67.3@50.05,19.125
NetVD68_K: VD68.K VT68.3 | length 8.8
  Top Layer w0.15: VD68.K@43.975,14.2 43.975,15.238 45.162,16.425 47.4,16.425 50.05,19.075 VT68.3@50.05,19.125
NetVD69_K: VD69.K VT69.3 | length 11.2
  Top Layer w0.15: VD69.K@42.6,14.2 v1(42.6,15.775)
  Bottom Layer w0.15: v1(42.6,15.775) 42.975,16.15 44.625,16.15 47.5,19.025 VT69.3@47.5,22.425
NetVD70_K: VD70.K VT70.3 | length 12.3
  Top Layer w0.15: VD70.K@41.225,14.2 41.225,15.213 42.762,16.75 45.25,16.75 47.5,19 VT70.3@47.5,22.425
NetVD71_K: VD71.K VT71.3 | length 8.1
  Top Layer w0.15: VD71.K@39.85,14.2 v1(39.85,15.775)
  Bottom Layer w0.15: v1(39.85,15.775) 41.575,15.775 44.55,18.75 44.6,18.75 44.925,19.075 VT71.3@44.925,19.125
NetVD72_K: VD72.K VT72.3 | length 9.1
  Top Layer w0.15: VD72.K@38.475,14.2 38.475,15.213 40.312,17.05 42.9,17.05 44.925,19.075 VT72.3@44.925,19.125
NetVD73_K: VD73.K VT73.3 | length 11.3
  Top Layer w0.15: VD73.K@37.1,14.2 v1(37.1,15.775)
  Bottom Layer w0.15: v1(37.1,15.775) 38.6,15.775 42.375,19.55 VT73.3@42.375,22.425
NetVD74_K: VD74.K VT74.3 | length 12.3
  Top Layer w0.15: VD74.K@35.725,14.2 35.725,15.213 36.887,16.375 39.2,16.375 42.375,19.55 VT74.3@42.375,22.425
NetVD75_K: VD75.K VT75.3 | length 8.4
  Top Layer w0.15: VD75.K@34.35,14.2 v1(34.35,15.775)
  Bottom Layer w0.15: v1(34.35,15.775) 35.881,17.306 38.031,17.306 39.8,19.075 VT75.3@39.8,19.125
NetVD76_K: VD76.K VT76.3 | length 9.5
  Top Layer w0.15: VD76.K@32.975,14.2 32.975,15.213 35.062,17.3 37.975,17.3 39.425,18.75 39.475,18.75 39.8,19.075 VT76.3@39.8,19.125
NetVD77_K: VD77.K VT77.3 | length 11.7
  Top Layer w0.15: VD77.K@31.6,14.2 v1(31.6,15.775)
  Bottom Layer w0.15: v1(31.6,15.775) 32.725,16.9 34.7,16.9 37.25,19.45 VT77.3@37.25,22.425
NetVD78_K: VD78.K VT78.3 | length 12.3
  Top Layer w0.15: VD78.K@30.225,14.2 30.225,15.213 31.912,16.9 33.9,16.9 37.25,20.25 VT78.3@37.25,22.425
NetVD79_K: VD79.K VT79.3 | length 8.8
  Top Layer w0.15: VD79.K@28.85,14.2 v1(28.85,15.775)
  Bottom Layer w0.15: v1(28.85,15.775) 30.386,15.775 31.886,17.275 32.875,17.275 34.675,19.075 VT79.3@34.675,19.125
NetVD80_K: VD80.K VT80.3 | length 9.9
  Top Layer w0.15: VD80.K@27.475,14.2 27.475,15.213 29.537,17.275 32.9,17.275 33.625,18 33.625,18.025 34.675,19.075 VT80.3@34.675,19.125
NetVD81_K: VD81.K VT81.3 | length 11.9
  Top Layer w0.15: VD81.K@26.1,14.2 v1(26.1,15.775)
  Bottom Layer w0.15: v1(26.1,15.775) 27.6,17.275 29.575,17.275 32.125,19.825 VT81.3@32.125,22.425
NetVD82_K: VD82.K VT82.3 | length 13
  Top Layer w0.15: VD82.K@24.725,14.2 24.725,15.213 27.087,17.575 29.925,17.575 32.15,19.8 32.15,22.4 VT82.3@32.125,22.425
NetVD83_K: VD83.K VT83.3 | length 9.5
  Top Layer w0.15: VD83.K@23.35,14.2 v1(23.35,15.775)
  Bottom Layer w0.15: v1(23.35,15.775) 25.15,17.575 28.625,17.575 29.55,18.5 VT83.3@29.55,19.125
NetVD84_K: VD84.K VT84.3 | length 10.2
  Top Layer w0.15: VD84.K@21.975,14.2 21.975,15.213 24.337,17.575 26.175,17.575 27.725,19.125 VT84.3@29.55,19.125
NetVD85_K: VD85.K VT85.3 | length 12
  Top Layer w0.15: VD85.K@20.6,14.2 v1(20.6,15.775)
  Bottom Layer w0.15: v1(20.6,15.775) 22.525,15.775 26.675,19.925 26.675,22.1 VT85.3@27,22.425
NetVD86_K: VD86.K VT86.3 | length 13.8
  Top Layer w0.15: VD86.K@19.225,14.2 19.225,15.275 20.325,16.375 22.713,16.375 24.213,17.875 25.9,17.875 26.675,18.65 26.675,22.1 VT86.3@27,22.425
NetVD87_K: VD87.K VT87.3 | length 9.6
  Top Layer w0.15: v1(17.825,15.775) 17.825,14.225 VD87.K@17.85,14.2
  Bottom Layer w0.15: v1(17.825,15.775) 19.686,15.775 20.311,16.4 21.7,16.4 24.05,18.75 24.1,18.75 24.425,19.075 VT87.3@24.425,19.125
NetVD88_K: VD88.K VT88.3 | length 10.6
  Top Layer w0.15: VD88.K@16.475,14.2 16.475,15.238 18.087,16.85 22.2,16.85 23.15,17.8 24.425,19.075 VT88.3@24.425,19.125
NetVD89_K: VD89.K VT89.3 | length 13.3
  Top Layer w0.15: VD89.K@15.1,14.2 v1(15.1,15.775)
  Bottom Layer w0.15: v1(15.1,15.775) 16.2,16.875 20.325,16.875 21.875,18.425 VT89.3@21.875,22.3
NetVD90_K: VD90.K VT90.3 | length 14.4
  Top Layer w0.15: VD90.K@13.725,14.2 14,14.475 14,15.488 15.662,17.15 20.675,17.15 21.875,18.35 VT90.3@21.875,22.3
NetVD91_K: VD91.K VT91.3 | length 9.9
  Top Layer w0.15: VD91.K@12.35,14.2 v1(12.35,15.775)
  Bottom Layer w0.15: v1(12.35,15.775) 14.287,15.775 15.687,17.175 17.525,17.175 19.3,18.95 VT91.3@19.3,19
NetVD92_K: VD92.K VT92.3 | length 10.9
  Top Layer w0.15: VD92.K@10.975,14.2 11.25,14.475 11.25,15.488 13.212,17.45 17.8,17.45 19.3,18.95 VT92.3@19.3,19
NetVD93_K: VD93.K VT93.3 | length 13.5
  Top Layer w0.15: VD93.K@9.6,14.2 v1(9.6,15.775)
  Bottom Layer w0.15: v1(9.6,15.775) 11.275,17.45 15.45,17.45 16.75,18.75 VT93.3@16.75,22.3
NetVD94_K: VD94.K VT94.3 | length 14.6
  Top Layer w0.15: VD94.K@8.225,14.2 8.225,15.213 10.812,17.8 15.825,17.8 16.75,18.725 VT94.3@16.75,22.3
NetVD95_K: VD95.K VT95.3 | length 10.2
  Top Layer w0.15: VD95.K@6.85,14.2 v1(6.85,15.775)
  Bottom Layer w0.15: v1(6.85,15.775) 10.075,19 VT95.3@14.175,19
NetVD96_K: VD96.K VT96.3 | length 11.3
  Top Layer w0.15: VD96.K@5.475,14.2 5.475,15.213 9.262,19 VT96.3@14.175,19
O\E\: DD1.16 DD2.13 DD3.13 DD4.13 DD5.13 DD6.13 DD7.13 DD8.13 DD9.13 DD10.13 DD11.13 DD12.13 DD13.13 R205.1 R206.1 R207.1 R208.1 R209.1 R210.1 R211.1 R212.1 R213.1 R214.1 R215.1 R216.1 | length 159
  Top Layer w0.15: R216.1@2.125,93.65 R215.1@3.625,93.65 R214.1@5.125,93.65 R213.1@6.625,93.65 R212.1@8.125,93.65 R211.1@9.625,93.65 ; DD13.13@7.525,86.08 7.545,86.1 v1(9.4,86.1) ; v1(9.35,91.55) 9.35,93.375 R211.1@9.625,93.65 ; DD12.13@17.875,86.08 17.895,86.1 v1(19.775,86.1) ; R205.1@18.65,93.65 18.625,93.675 R206.1@17.125,93.675 17.1,93.65 R207.1@15.625,93.65 R208.1@14.125,93.65 R209.1@12.625,93.65 R210.1@11.125,93.65 R211.1@9.625,93.65 ; DD11.13@28.375,86.08 28.395,86.1 v1(30.275,86.1) ; DD10.13@39.225,86.08 39.245,86.1 v1(41.025,86.1) ; DD9.13@49.225,86.08 49.37,86.225 v1(51.025,86.225) ; DD8.13@58.875,86.08 58.895,86.1 v1(60.8,86.1) ; DD7.13@68.675,86.08 68.695,86.1 v1(70.525,86.1) ; DD6.13@77.825,86.08 77.845,86.1 v1(79.65,86.1) ; DD5.13@86.525,86.08 86.545,86.1 v1(88.3,86.1) ; DD4.13@94.875,86.08 95.02,86.225 95.07,86.175 v1(97,86.175) ; DD3.13@103.754,86.138 103.841,86.225 v1(105.525,86.225) ; DD2.13@112.529,86.138 112.616,86.225 v1(114.425,86.225)
  Bottom Layer w0.15: v1(9.35,91.55) 9.4,91.5 v1(9.4,86.1) v1(19.775,86.1) v1(30.275,86.1) v1(41.025,86.1) 50.9,86.1 v1(51.025,86.225) 60.675,86.225 v1(60.8,86.1) v1(70.525,86.1) v1(79.65,86.1) 88.525,86.1 88.55,86.125 96.5,86.125 96.95,86.125 v1(97,86.175) ; v1@96.925,86.1 97.1,86.275 97.15,86.225 v1(105.525,86.225) v1(114.425,86.225) 114.425,86.529 DD1.16@118.985,91.089
Red: DD1.8 VD98.K | length 168.9
  Top Layer w0.15: v1(5.357,65.757) 8.65,62.463 VD98.K@8.65,48.95 ; DD1.8@118.985,111.409 121.05,109.345 v1(121.05,109)
  Bottom Layer w0.15: v1(5.357,65.757) 5.275,65.838 5.275,89.225 12.225,96.175 107.099,96.175 118.524,107.6 119.65,107.6 v1(121.05,109)
SCK: DD1.30 DD2.11 DD3.11 DD4.11 DD5.11 DD6.11 DD7.11 DD8.11 DD9.11 DD10.11 DD11.11 DD12.11 DD13.11 | length 160.5
  Top Layer w0.15: DD13.11@7.525,83.54 7.555,83.57 9.37,83.57 v1(9.4,83.6) ; DD12.11@17.875,83.54 17.905,83.57 19.745,83.57 v1(19.775,83.6) ; DD11.11@28.375,83.54 28.405,83.57 30.245,83.57 v1(30.275,83.6) ; DD10.11@39.225,83.54 39.255,83.57 40.995,83.57 v1(41.025,83.6) ; DD9.11@49.225,83.54 49.255,83.57 50.995,83.57 v1(51.025,83.6) ; DD8.11@58.875,83.54 58.905,83.57 60.745,83.57 v1(60.775,83.6) ; DD7.11@68.675,83.54 68.705,83.57 70.495,83.57 v1(70.525,83.6) ; DD6.11@77.825,83.54 77.855,83.57 79.62,83.57 v1(79.65,83.6) ; DD5.11@86.525,83.54 86.555,83.57 v1(88.3,83.57) ; DD4.11@94.905,83.57 97.019,83.57 v1(97.019,83.575) ; DD3.11@103.754,83.598 DD3.11@103.754,83.598 v1(105.575,83.6) v1(105.575,83.6) ; DD2.11@112.529,83.598 v1@114.202,83.598
  Bottom Layer w0.15: v1(9.4,83.6) v1(19.775,83.6) v1(30.275,83.6) v1(41.025,83.6) v1(51.025,83.6) v1(60.775,83.6) v1(70.525,83.6) v1@88.3,83.6 ; v1(88.3,83.57) v1@88.3,83.6 ; DD1.30@134.2,103.8 131.225,103.8 121.175,93.75 121.175,85.55 120.325,84.7 117.925,84.7 116.95,83.725 v1(114.4,83.725) 114.338,83.662 105.638,83.662 v1(105.575,83.6) 97.225,83.6 97.2,83.575 88.525,83.575 88.45,83.65 88.4,83.6 v1@88.3,83.6
SCK_1: DD1.2 DD14.2 DD15.2 DD16.2 DD17.2 DD18.2 DD19.2 DD20.2 DD21.2 DD22.2 DD23.2 DD24.2 DD25.2 | length 243.7
  Top Layer w0.15: v1(14.65,41.6) 14.7,41.65 24.525,41.65 v1(24.575,41.7) ; v1@24.525,41.675 v1(35.05,41.675) ; v1@35.05,41.646 45.194,41.646 v1(45.222,41.618) ; v1@45.231,41.609 45.269,41.646 55.596,41.646 v1(55.625,41.675) ; v1@55.625,41.7 65.475,41.7 v1(65.5,41.725) ; v1@65.5,41.65 v1@75.25,41.65 ; v1@75.262,41.637 75.287,41.662 85.016,41.662 85.053,41.7 95.375,41.7 95.4,41.725 105.925,41.725 v1@116.725,41.725 ; v1(116.775,59.7) 116.75,59.675 116.75,41.75 v1@116.725,41.725 ; v1@116.88,41.712 126.287,41.712 v1(126.3,41.7) ; v1(116.88,41.725) v1@116.725,41.725 ; DD1.2@118.985,126.649 122.675,122.96 v1(122.675,90.025)
  Bottom Layer w0.15: v1(14.65,41.6) 14.475,41.775 14.475,43.526 14.994,44.045 15.219,44.27 DD25.2@15.829,44.27 ; v1(24.575,41.7) 24.5,41.775 24.5,43.33 24.717,43.547 25.367,44.198 25.729,44.198 DD24.2@25.729,44.27 ; v1(35.05,41.675) 35.025,41.7 35.025,42.2 34.95,42.275 34.95,43.18 35.317,43.547 36.131,43.547 36.329,43.745 DD23.2@36.329,44.27 ; v1(45.222,41.618) 45.222,42.355 45.025,42.552 45.025,43.255 45.494,43.724 45.494,44.045 45.719,44.27 DD22.2@46.329,44.27 ; v1(55.625,41.675) 55.625,41.975 55.525,42.075 55.525,42.275 55.525,43.635 55.623,43.733 55.995,44.105 56.664,44.105 DD21.2@56.829,44.27 ; v1(65.5,41.725) 65.219,42.006 65.219,42.651 65.219,43.67 65.594,44.045 65.819,44.27 DD20.2@66.429,44.27 ; v1(75.275,41.65) 75.219,41.706 75.219,43.67 75.594,44.045 75.819,44.27 DD19.2@76.429,44.27 ; v1@85.1,41.85 85.019,41.931 85.019,43.647 85.394,44.022 85.619,44.247 DD18.2@86.229,44.247 ; v1(95.475,41.725) 95.4,41.8 95.4,43.628 95.794,44.022 96.019,44.247 DD17.2@96.629,44.247 ; v1(105.975,41.725) 105.925,41.775 105.925,43.655 106.315,44.045 106.54,44.27 DD16.2@107.15,44.27 ; v1(116.775,59.7) 117.3,59.7 118.875,61.275 120.4,62.8 120.4,63.625 121.225,64.45 122.175,64.45 122.72,64.995 122.72,89.98 v1(122.675,90.025) ; v1(116.88,41.725) 116.725,41.88 116.725,42.593 116.725,43.184 116.725,43.505 117.013,43.793 117.265,44.045 117.49,44.27 DD15.2@118.1,44.27 ; v1(126.3,41.7) 126.3,42.015 126.2,42.115 126.2,42.242 126.2,42.389 126.2,42.566 126.2,43.53 126.715,44.045 126.94,44.27 DD14.2@127.55,44.27
  other v1: 85.2,41.675
SCL: DD1.14 R321.1 X7.4 | length 23
  Top Layer w0.15: R321.1@105.65,111.375 107.24,111.375 107.828,111.963 X7.4@108.102,111.963 109.725,110.34 109.725,109.275 114.5,104.5 114.5,100.655 DD1.14@118.985,96.169
SDA: DD1.15 R322.1 X7.3 | length 23.8
  Top Layer w0.15: R322.1@105.65,107 105.8,107 108.102,109.302 X7.3@108.102,109.423 113.805,103.72 113.805,98.809 DD1.15@118.985,93.629
SH/L\D\: DD1.5 DD14.1 DD15.1 DD16.1 DD17.1 DD18.1 DD19.1 DD20.1 DD21.1 DD22.1 DD23.1 DD24.1 DD25.1 | length 236.4
  Top Layer w0.15: v1(15.75,40.175) 15.762,40.163 25.588,40.163 v1(25.6,40.15) ; v1@25.662,40.163 36.263,40.163 v1(36.275,40.175) 36.287,40.163 46.313,40.163 v1(46.325,40.15) 46.337,40.163 56.813,40.163 56.85,40.2 66.338,40.2 66.35,40.188 76.291,40.188 76.328,40.15 80.98,40.15 81.217,40.388 85.625,40.388 85.751,40.261 86.139,40.261 v1(86.225,40.175) 91.276,40.175 91.488,40.388 96.612,40.388 96.65,40.35 107.275,40.35 v1(107.3,40.325) 107.375,40.4 v1(118.2,40.4) ; v1@118.262,40.412 127.387,40.412 v1(127.45,40.35) 127.572,40.35 127.722,40.2 131.35,40.2 132.525,41.375 132.525,57.45 v1(130.35,59.625) ; DD1.5@118.985,119.029 121.85,116.165 v1(121.85,92.375)
  Bottom Layer w0.15: v1(15.75,40.175) 15.825,40.25 15.825,42.996 DD25.1@15.829,43 ; v1(25.6,40.15) 25.6,42.871 DD24.1@25.729,43 ; v1(36.275,40.175) 36.275,42.946 DD23.1@36.329,43 ; v1(46.325,40.15) 46.275,40.2 46.275,42.946 DD22.1@46.329,43 ; v1(56.825,40.175) 56.825,42.996 DD21.1@56.829,43 ; v1(66.35,40.225) 66.35,42.921 DD20.1@66.429,43 ; DD19.1@76.429,43 76.45,42.979 v1(76.45,40.15) ; v1(86.225,40.175) 86.225,42.973 DD18.1@86.229,42.977 ; v1(96.625,40.375) 96.625,42.973 DD17.1@96.629,42.977 ; DD16.1@107.15,43 107.3,42.85 v1(107.3,40.325) ; DD15.1@118.1,43 118.2,42.9 v1(118.2,40.4) ; v1(121.85,92.375) 125.325,92.375 130.34,87.36 130.34,59.635 v1(130.35,59.625) ; v1(127.45,40.35) 127.45,42.9 DD14.1@127.55,43
ST_CP: DD1.17 DD2.12 DD3.12 DD4.12 DD5.12 DD6.12 DD7.12 DD8.12 DD9.12 DD10.12 DD11.12 DD12.12 DD13.12 | length 134.1
  Top Layer w0.15: DD13.12@7.525,84.81 7.565,84.85 v1(9.4,84.85) ; DD12.12@17.875,84.81 17.915,84.85 v1(19.775,84.85) ; DD11.12@28.375,84.81 28.415,84.85 v1(30.275,84.85) ; DD10.12@39.225,84.81 39.265,84.85 v1(41.025,84.85) ; DD9.12@49.225,84.81 49.265,84.85 v1(51.025,84.85) ; DD8.12@58.875,84.81 58.915,84.85 v1(60.775,84.85) ; DD7.12@68.675,84.81 68.715,84.85 v1(70.525,84.85) ; DD6.12@77.825,84.81 77.865,84.85 v1(79.65,84.85) ; DD5.12@86.525,84.81 86.69,84.975 86.84,84.825 v1(88.3,84.825) ; DD4.12@94.915,84.85 97.025,84.85 97.072,84.897 v1(97.019,84.95) ; DD3.12@103.754,84.868 103.861,84.975 v1(105.525,84.975) ; DD2.12@112.529,84.868 112.636,84.975 v1(114.4,84.975)
  Bottom Layer w0.15: v1(9.4,84.85) v1(19.775,84.85) v1(30.275,84.85) v1(41.025,84.85) v1(51.025,84.85) v1(60.775,84.85) v1(70.525,84.85) v1@88.3,84.85 ; v1(88.3,84.825) v1@88.3,84.85 ; v1(97.019,84.95) v1@97.072,84.897 ; DD1.17@118.985,88.549 115.411,84.975 v1(114.4,84.975) 97.15,84.975 97.125,84.95 97.025,84.85 88.425,84.85 88.4,84.825 88.375,84.85 v1@88.3,84.85
pads on no net: DD1.1 DD1.4 DD1.6 DD1.13 DD1.20 DD1.21 DD1.22 DD1.23 DD1.24 DD1.25 DD1.26 DD1.27 DD1.28 DD1.29 DD1.31 DD1.33 DD1.34 DD1.35 DD1.36 DD1.37 DD1.38 DD13.9 DD14.7 DD14.10 DD15.7 DD16.7 DD17.7 DD18.7 DD19.7 DD20.7 DD21.7 DD22.7 DD23.7 DD24.7 DD25.7 FP1.1 FP2.1 FP3.1 FP4.1 S1.3 S1.4 S2.3 S2.4 S3.3 S3.4 S4.3 S4.4 X7.

## Polygon pours and split planes (outlines as drawn)
GND on Top Layer "GND_L01_P000" (solid, pour order 0): 0,140 140,140 140,0 0,0
GND on Bottom Layer "GND_L02_P001" (solid, pour order 1): 0.535,139.49 139.515,139.49 139.515,0.51 0.535,0.51

## Keep-outs
Keep-Out Layer:
  lines w0.2: 0,0 0,140 140.025,140 140.025,0 0,0

## Silkscreen, mask and mechanical layers (free items; w line width, h text height)
Top Overlay:
  lines w0.21: 6.35,44.875 12.15,44.875 12.15,46.675 6.35,46.675 6.35,44.875
  lines w0.215: 5.675,48.045 12.125,48.045 12.125,49.795 5.675,49.795 5.675,48.045
  lines w0.3: 89,124.6 89,123.1 89,123 89.5,122.5 91.5,122.5 ; 90.8,121.8 91.5,122.5 ; 90.8,123.2 91.5,122.5 ; 103.05,122.825 103.8,122.075 ; 103.05,134.3 103.8,135.05 ; 103.8,124.525 103.8,122.075 ; 103.8,132.6 103.8,135.05 ; 104.55,122.825 103.8,122.075 ; 104.55,134.3 103.8,135.05
  text "OK" at 90.2,132.6 h1.5
  text "FAIL" at 5.225,49.4 h1.5 r180
  text "PASS" at 5.87,46.257 h1.5 r180